# Altium PCB PCB_Final.PcbDoc (part 1 of 2)
Units mm, origin at the board's own origin, x right, y up, seen from the top; angles counter-clockwise.
Board outline 220 x 130 mm, 2 copper layers (Top Layer, Bottom Layer); 112 components, 88 nets, 442 pads, 69 vias.
Unrouted connection lines stored in the file: 1.
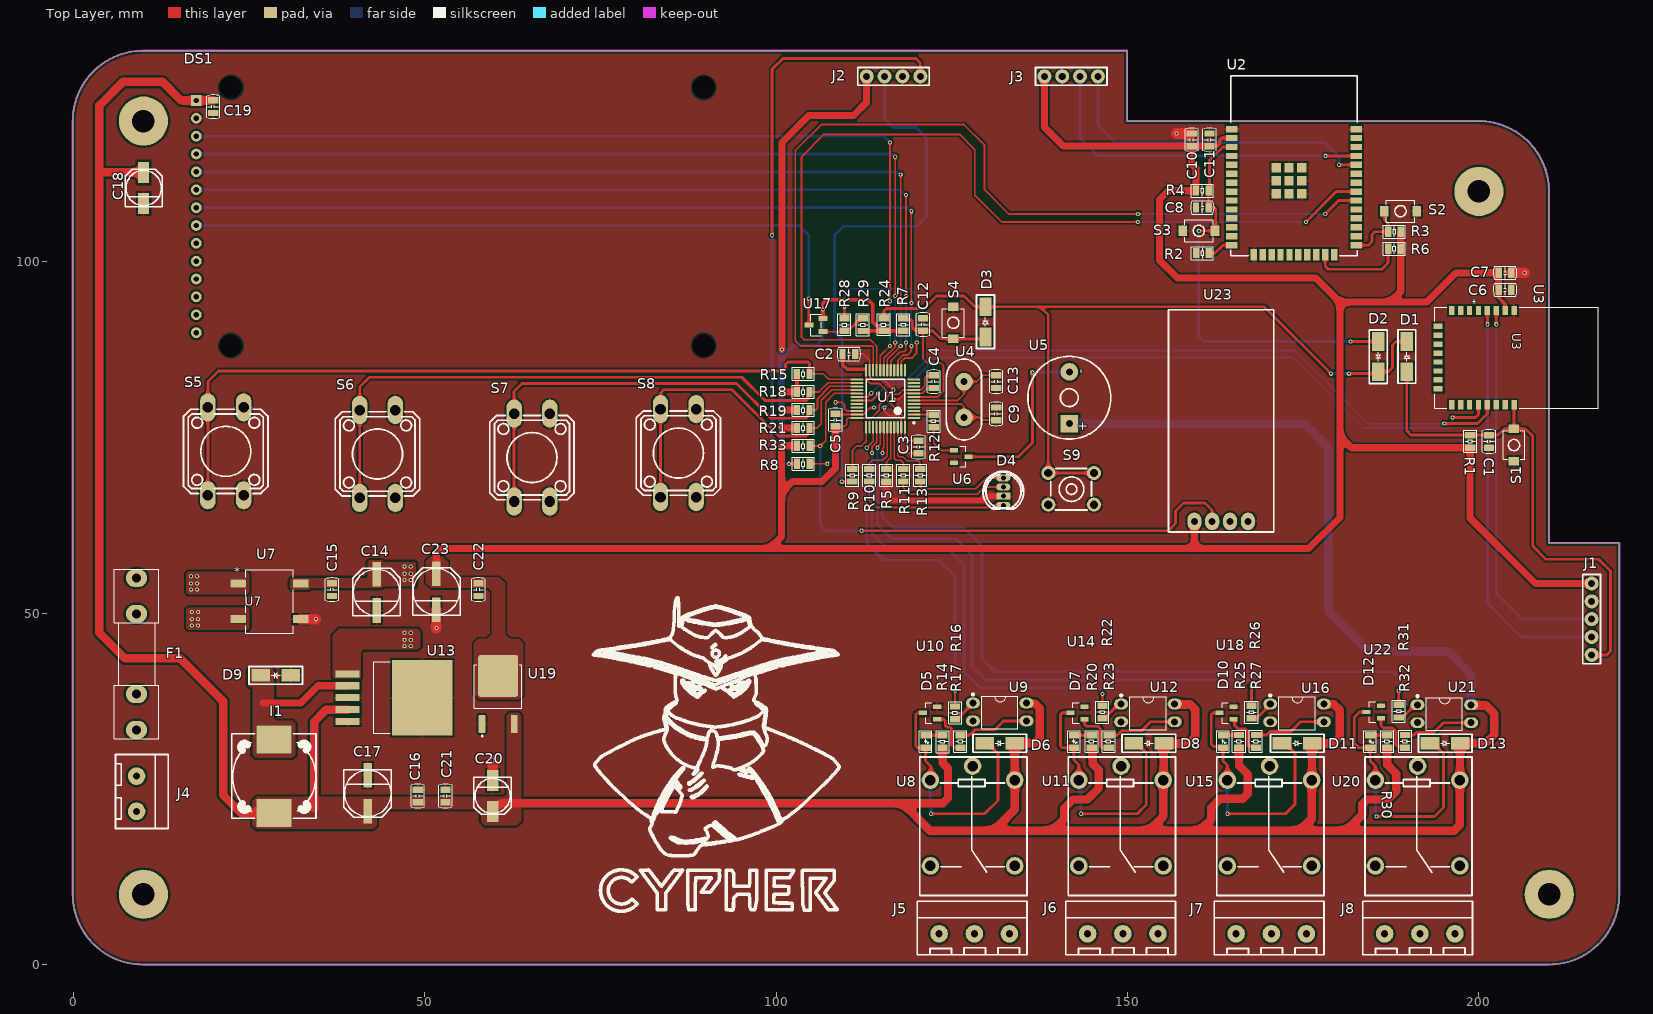
[diagram p0: Top Layer view]
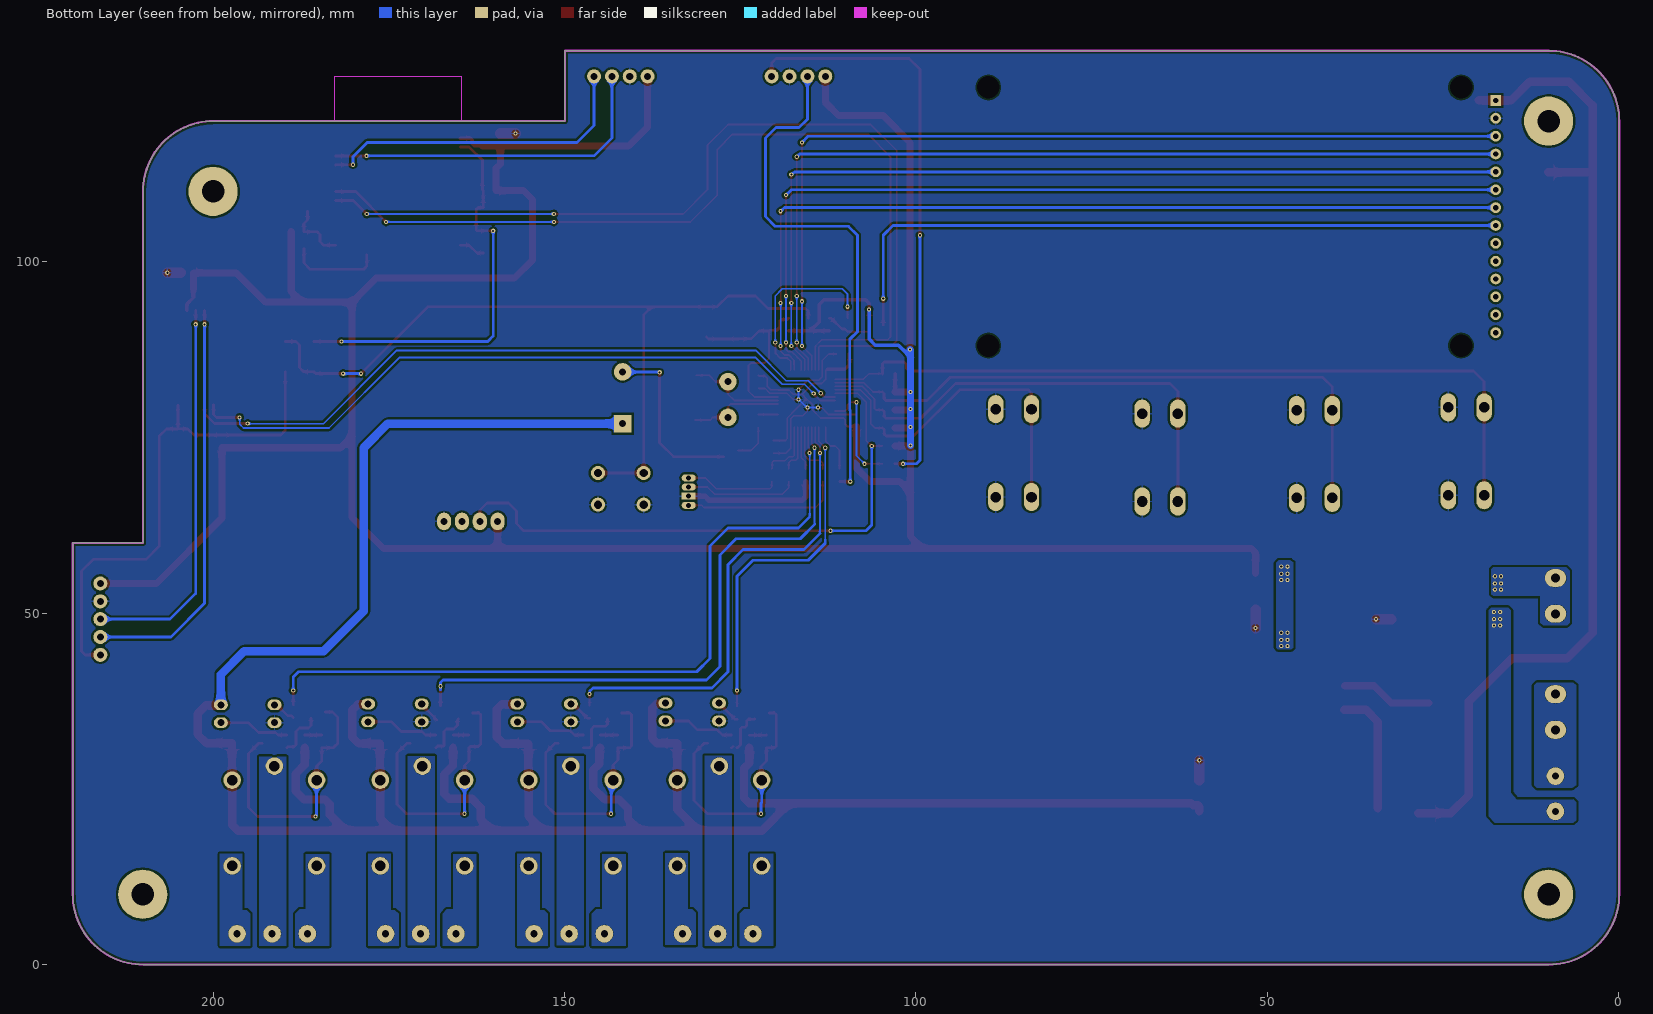
[diagram p1: Bottom Layer view, seen from below]
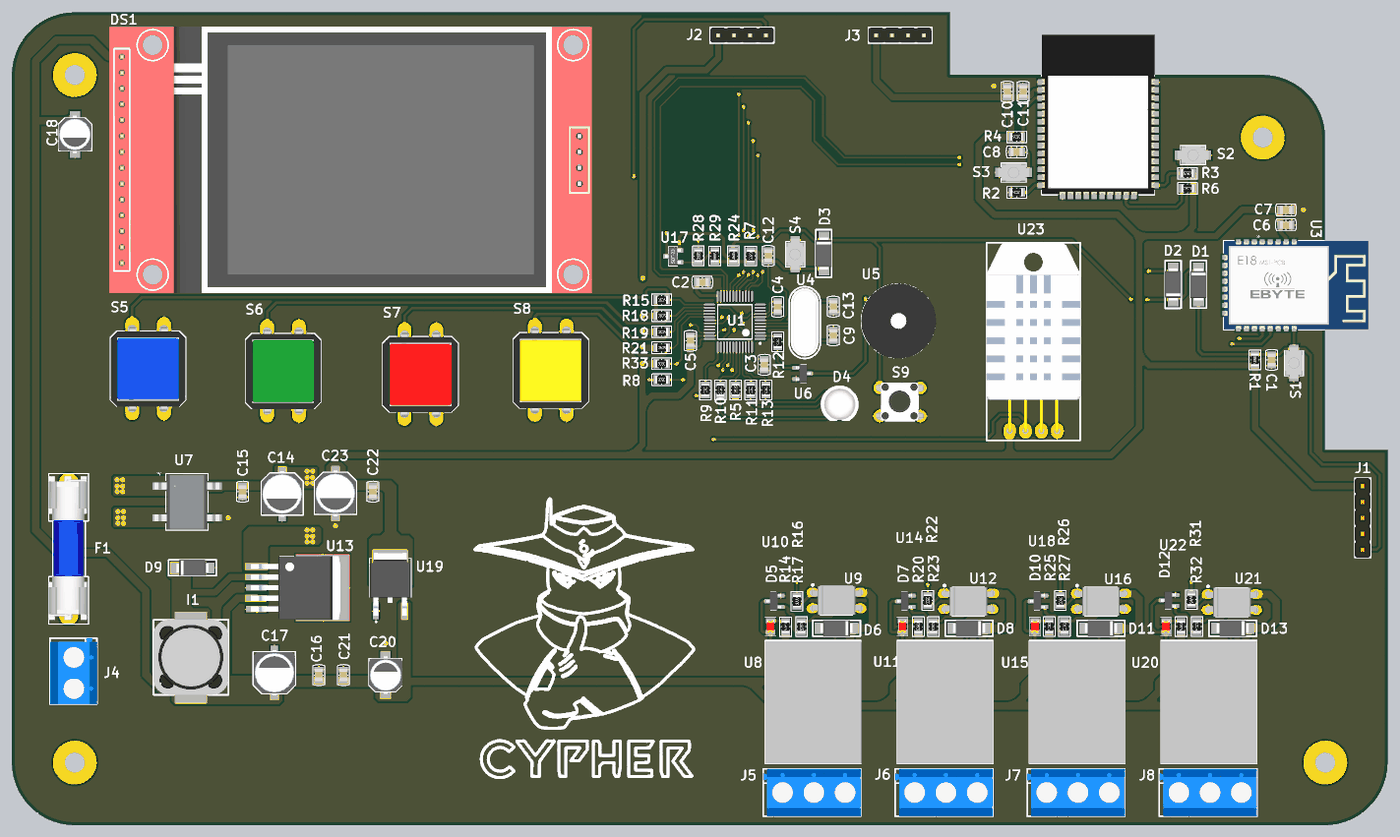
[diagram p2: 3D render of the assembled board from above, using the file's embedded part models]

## Layer stack, top to bottom
Top Solder: solder mask 0.0102, Solder Resist, Dk 3.5
Top Layer: signal copper 0.0356
Dielectric 1: dielectric 0.32, FR-4, Dk 4.8
Bottom Layer: signal copper 0.0356
Bottom Solder: solder mask 0.0102, Solder Resist, Dk 3.5

## Board outline
-0.047,10.006 -0.047,120.006 cw(c9.953,120.006) 9.953,130.006 149.953,130.006 149.953,120.006 199.953,120.006 cw(c199.953,110.006) 209.953,110.006 209.953,60.006 219.953,60.006 219.953,10.006 cw(c209.953,10.006) 209.953,0.006 9.953,0.006 cw(c9.953,10.006)

## Design rules (kind name [scope] priority, off if disabled: settings)
Clearance [All] p1: gap=0.2 ignorepadtopadclearanceinfootprint=FALSE except(0.3: Arc-Fill Arc-Poly Arc-Region Track-Fill Track-Poly Track-Region SMDPad-Fill SMDPad-Poly SMDPad-Region THPad-Fill THPad-Poly THPad-Region Via-Fill Via-Poly Via-Region Fill-Fill Fill-Poly Fill-Region Poly-Poly Poly-Region Region-Region)
PolygonConnect Power [InNet('+12') Or InNet('+5') Or InNet('+3.3')] p1: connectstyle=Direct reliefconductorwidth=0.254 reliefentries=4 polygonreliefangle="90 Angle" airgapwidth=0.254
PolygonConnect GND_PL [InNet('GND')] p2: connectstyle=Relief reliefconductorwidth=0.254 reliefentries=4 polygonreliefangle="90 Angle" airgapwidth=0.254
RoutingVias [All] p1: holewidth=0.3 width=0.6 viastyle="Through Hole" minholewidth=0.3 minwidth=0.6 maxholewidth=0.3 maxwidth=0.6
SolderMaskExpansion [All] p1: expansion=0.102 istentingtop=FALSE
SupplyNets "Schematic Supply Nets_3" [InNet('+12')] p1: voltage=0.000
SupplyNets "Schematic Supply Nets_2" [InNet('+3.3')] p2: voltage=0.000
SupplyNets "Schematic Supply Nets_1" [InNet('GND')] p3: voltage=0.000
SupplyNets "Schematic Supply Nets" [InNet('+5')] p4: voltage=0.000
Width GND [InNet('GND')] p1: maxlimit=1.5 minlimit=0.25 preferedwidth=0.8
Width 12V [InNet('+12')] p2: maxlimit=2 minlimit=0.3 preferedwidth=1
Width 5V [InNet('+5')] p3: maxlimit=1.2 minlimit=0.25 preferedwidth=0.6
Width 3.3V [InNet('+3.3')] p4: maxlimit=1 minlimit=0.25 preferedwidth=0.5
Width SIG [All] p5: maxlimit=0.4 minlimit=0.15 preferedwidth=0.25
30 further rules are at their usual default settings.

## Classes and differential pairs
component class Nguyen_Ly: C1 C2 C3 C4 C5 C6 C7 C8 C9 C10 C11 C12 C13 C14 C15 C16 C17 C18 C19 C20 C21 C22 C23 D1 D2 D3 D4 D5 D6 D7 D8 D9 D10 D11 D12 D13 DS1 F1 I1 J1 J2 J3 J4 J5 J6 J7 J8 R1 R2 R3 R4 R5 R6 R7 R8 R9 R10 R11 R12 R13 R16 R17 R18 R19 R20 R21 R22 R23 R24 R25 R26 R27 R28 R29 R30 R31 R32 R33 S1 S2 S3 S4 S5 S6 S7 S8 S9 U1 U2 U3 U4 U5 U6 U7 U8 U9 U11 U13 U19 U20 U21 U22 U23

## Components (designator, comment, footprint, x,y, rotation, side; value= is the part's Value field where it differs from the comment)
C1 "100nF" "CAPACITOR 0805" 201.422,74.433 r90 top
C2 "100nF" "CAPACITOR 0805" 110.363,86.868 r180 top
C3 "100nF" "CAPACITOR 0805" 120.269,73.649 r90 top
C4 "100nF" "CAPACITOR 0805" 122.428,82.931 r90 top
C5 "100nF" "CAPACITOR 0805" 108.458,77.47 r270 top
C6 "100nF" "CAPACITOR 0805" 203.708,96.012 r180 top
C7 "10uF" "CAPACITOR 0805" 203.708,98.425 r180 top
C8 "100nF" "CAPACITOR 0805" 160.644,107.696 r0 top
C9 "100nF" "CAPACITOR 0805" 131.318,78.359 r90 top
C10 "100nF" "CAPACITOR 0805" 159.131,117.337 r270 top
C11 "10uF" "CAPACITOR 0805" 161.671,117.337 r270 top
C12 "CAPACITOR 0805" "CAPACITOR 0805" 120.904,91.059 r270 top
C13 "100nF" "CAPACITOR 0805" 131.318,82.942 r270 top
C14 "220uF/16V" ALUMINUM_7mm 43.18,52.959 r0 top
C15 "100nF" "CAPACITOR 0805" 36.83,53.351 r90 top
C16 "100nF" "CAPACITOR 0805" 49.022,23.992 r270 top
C17 "220uF" ALUMINUM_7mm 41.91,24.384 r180 top
C18 "47uF" ALUMINUM_5mm 10.033,110.49 r0 top
C19 "100nF" "CAPACITOR 0805" 19.939,122.058 r90 top
C20 "47uF" ALUMINUM_5mm 59.69,24.003 r180 top
C21 "100nF" "CAPACITOR 0805" 52.959,23.992 r270 top
C22 "100nF" "CAPACITOR 0805" 57.658,53.351 r90 top
C23 "220uF" ALUMINUM_7mm 51.689,53.046 r0 top
D1 "M7" DIODE_SMA 189.738,86.496 r0 top
D2 "M7" DIODE_SMA 185.674,86.496 r180 top
D3 "M7" DIODE_SMA 129.794,91.44 r0 top
D4 "LED_RGB" LED_RGB_5mm 132.334,67.295 r90 top
D5 "LED_0805_RED" LED_0805_RED 121.285,31.75 r180 top
D6 "M7" DIODE_SMA 131.826,31.496 r270 top
D7 "LED_0805_RED" LED_0805_RED 142.367,31.75 r180 top
D8 "M7" DIODE_SMA 153.035,31.496 r270 top
D9 "SS34" DIODE_SMA 28.829,41.148 r90 top
D10 "LED_0805_RED" LED_0805_RED 163.576,31.75 r180 top
D11 "M7" DIODE_SMA 174.126,31.496 r270 top
D12 "LED_0805_RED" LED_0805_RED 184.531,31.75 r180 top
D13 "M7" DIODE_SMA 195.19,31.496 r270 top
DS1 "TFT 2.4 Inch" "TFT 2.4 Inch" 15.526,85.066 r0 top
F1 "F1A" Fuse 9.017,44.196 r90 top value=Fuse
I1 "1260" 1260 28.575,26.797 r270 top
J1 "CC DEBUGGER" MALE-2.54-5P 216.027,49.149 r0 top
J2 "ST LINK" MALE-2.54-4P 116.713,126.365 r90 top
J3 "USB TTL" MALE-2.54-4P 141.986,126.365 r90 top
J4 "12AC" BORNE-5.00-2P 9.779,24.638 r180 top
J5 "BORNE-5.00-3P" BORNE-5.00-3P 127.889,5.207 r270 top
J6 "BORNE-5.00-3P" BORNE-5.00-3P 149.013,5.207 r270 top
J7 "BORNE-5.00-3P" BORNE-5.00-3P 170.138,5.207 r270 top
J8 "BORNE-5.00-3P" BORNE-5.00-3P 191.262,5.207 r270 top
R1 "RESISTOR_0805" RESISTOR_0805 198.755,74.433 r270 top
R2 "10K" RESISTOR_0805 160.666,101.219 r180 top
R3 "10K" RESISTOR_0805 187.971,104.267 r180 top
R4 "RESISTOR_0805" RESISTOR_0805 160.655,110.109 r180 top
R5 "RESISTOR_0805" RESISTOR_0805 115.691,69.605 r90 top
R6 "10K" RESISTOR_0805 187.971,101.854 r0 top
R7 "RESISTOR_0805" RESISTOR_0805 118.11,91.059 r270 top
R8 "33" RESISTOR_0805 103.878,71.247 r180 top
R9 "33" RESISTOR_0805 110.851,69.618 r270 top
R10 "220" RESISTOR_0805 113.269,69.618 r270 top
R11 "220" RESISTOR_0805 118.105,69.618 r270 top
R12 "1K" RESISTOR_0805 122.428,77.332 r270 top
R13 "220" RESISTOR_0805 120.523,69.618 r270 top
R14 "220" RESISTOR_0805 123.698,31.739 r270 top
R15 "RESISTOR_0805" RESISTOR_0805 103.865,84.032 r0 top
R16 "1K" RESISTOR_0805 125.476,35.814 r270 top
R17 "1K" RESISTOR_0805 126.238,31.75 r270 top
R18 "RESISTOR_0805" RESISTOR_0805 103.865,81.474 r0 top
R19 "RESISTOR_0805" RESISTOR_0805 103.865,78.917 r0 top
R20 "220" RESISTOR_0805 144.907,31.75 r270 top
R21 "RESISTOR_0805" RESISTOR_0805 103.865,76.359 r0 top
R22 "1K" RESISTOR_0805 146.431,35.941 r270 top
R23 "1K" RESISTOR_0805 147.32,31.75 r270 top
R24 "RESISTOR_0805" RESISTOR_0805 115.316,91.059 r90 top
R25 "220" RESISTOR_0805 165.862,31.761 r270 top
R26 "1K" RESISTOR_0805 167.64,35.93 r270 top
R27 "1K" RESISTOR_0805 168.275,31.761 r270 top
R28 "220" RESISTOR_0805 109.728,91.059 r90 top
R29 "10K" RESISTOR_0805 112.343,91.046 r90 top
R30 "220" RESISTOR_0805 186.944,31.75 r270 top
R31 "1K" RESISTOR_0805 188.595,36.068 r270 top
R32 "1K" RESISTOR_0805 189.484,31.761 r270 top
R33 "10K" RESISTOR_0805 103.878,73.805 r180 top
S1 "PUSH_BUTTON_SMD_3X4X2" PUSH_BUTTON_SMD_3X4X2 204.978,73.914 r90 top
S2 "PUSH_BUTTON_SMD_3X4X2" PUSH_BUTTON_SMD_3X4X2 188.849,107.188 r0 top
S3 "PUSH_BUTTON_SMD_3X4X2" PUSH_BUTTON_SMD_3X4X2 160.147,104.394 r0 top
S4 "PUSH_BUTTON_SMD_3X4X2" PUSH_BUTTON_SMD_3X4X2 125.222,91.313 r270 top
S5 "PUSH_BUTTON_12X12" PUSH_BUTTON_12X12_BLUE 21.717,73.025 r90 top
S6 "PUSH_BUTTON_12X12" PUSH_BUTTON_12X12_GREEN 43.307,72.644 r90 top
S7 "PUSH_BUTTON_12X12" PUSH_BUTTON_12X12_RED 65.278,72.136 r90 top
S8 "PUSH_BUTTON_12X12" PUSH_BUTTON_12X12_YELLOW 86.106,72.771 r90 top
S9 "PUSH_BUTTON_6X6" PUSH_BUTTON_6X6 141.986,67.691 r180 top
U1 "STM32F103C8T6" STM-LQFP48_N 115.57,80.518 r180 top
U2 "ESP32-WROOM-32D" ESP32-WROOM-32D 173.683,109.915 r0 top
U3 "E18-MS1-PCB" E18-MS1-PCB_BYT 205.359,86.36 r270 top
U4 "8 MHz" CRISTAL_16Mhz 126.746,80.391 r270 top
U5 "BUZZER" BUZZER_12mm 141.732,80.645 r270 top
U6 "J3Y" J3Y 126.365,72.263 r270 top
U7 "DB107S" DB107S 27.94,51.689 r0 top
U8 "RELE" RELE 128.079,19.685 r270 top
U9 "PC817" PC817_DIP 131.826,35.941 r270 top
U10 "MMBT2222A" J3Y 121.92,35.814 r90 top
U11 "RELE" RELE 149.204,19.685 r270 top
U12 "PC817" PC817_DIP 152.908,35.814 r270 top
U13 "LM2596" LM2596 45.387,37.973 r180 top
U14 "MMBT2222A" J3Y 142.875,35.814 r90 top
U15 "RELE" RELE 170.328,19.685 r270 top
U16 "PC817" PC817_DIP 174.117,35.814 r270 top
U17 "AP3P080N" SOT23-3 105.68,90.998 r0 top
U18 "MMBT2222A" J3Y 164.084,35.814 r90 top
U19 "AMS1117-TO252" AMS117-TO252 60.452,38.481 r0 top
U20 "RELE" RELE 191.389,19.685 r270 top
U21 "PC817" PC817_DIP 195.072,35.687 r270 top
U22 "MMBT2222A" J3Y 185.039,35.941 r90 top
U23 "DHT22" DHT22_90 163.322,77.343 r270 top

## Footprints (in the part's own frame and the unit in brackets; to place one, negate y for a bottom-side part, rotate by r counter-clockwise, add the part's x,y. Pads: shape width x height; smd on the part's side, far side on the other; paste and mask are expansions set on the pad)
1260 [mm]
  rect 4x5 smd: 1(-5.25,0) 2(5.25,0)
  silkscreen extent -6.04,-6 5.96,6, body extent -6.07,-6.02 5.93,5.98, height 7.46
ALUMINUM_5mm [mm] "ALUMINUM CAPACITOR 5mm"
  rect 1.6x3 smd: 1(0,2.213) 2(0,-2.213)
  silkscreen extent -2.64,-2.66 2.66,2.64, body extent -2.67,-2.99 2.63,3.01, height 5.81
ALUMINUM_7mm [mm] "ALUMINUM CAPACITOR 7mm"
  rect 1.2x3.5 smd: 1(0,2.58) 2(0,-2.58)
  silkscreen extent -3.38,-3.36 3.38,3.4, body extent -3.32,-3.64 3.28,3.66, height 5.8
AMS117-TO252 [mm]
  rrect25% 0.95x2.59 smd: 1(-2.286,-4.26) 3(2.286,-4.26)
  rrect10% 5.63x5.94 smd: 2(0,2.59)
  silkscreen extent -3.35,-6.07 3.35,4.19, body extent -3.3,-5.05 3.3,5.05, height 2.2
BORNE-5.00-2P [mm]
  round 2.5 hole 1: 1(0.753,2.821) 2(0.753,-2.18)
  silkscreen extent -3.75,-5.27 3.75,5.27, body extent -3.86,-5.28 3.74,5.32, height 10.1
BORNE-5.00-3P [mm]
  round 2.5 hole 1: 1(0.815,5.318) 2(0.815,0.317) 3(0.815,-4.683)
  silkscreen extent -3.8,-7.81 3.8,7.81, body extent -3.8,-7.79 3.8,7.81, height 10.1
BUZZER_12mm [mm] "BUZZER MAGNETIC 12MM"
  rect 2.5x2.5 hole 1: 1(3.688,0)
  round 2.5 hole 1: 2(-3.688,0)
  silkscreen extent -5.9,-5.9 5.89,5.88, body extent -6,-5.98 5.99,6.02, height 9.51
"CAPACITOR 0805" [mm]
  rect 0.9x1.45 smd: 1(-0.9,0) 2(0.9,0)
  silkscreen extent -1.68,-0.95 1.67,0.95, body extent -1.03,-0.62 0.97,0.63, height 0.61
CRISTAL_16Mhz [mm] "CRYSTAL 16MHZ PTH"
  round 2.5 hole 1: 1(-2.54,0) 2(2.54,0)
  silkscreen extent -5.75,-2.56 5.75,2.56, body extent -5.56,-2.24 5.44,2.26, height 3.55
DB107S [mm]
  rect 2.224x1.142 smd paste+0 mask+0: 1(-4.432,2.55) 2(-4.432,-2.55) 3(4.432,-2.55) 4(4.432,2.55)
  silkscreen extent -3.38,-4.52 3.38,4.52, body extent -5.19,-4.39 5.19,4.39, height 3.41
DHT22_90 [mm]
  oval 2.5x2 hole 1: 1(14.287,-3.81) 2(14.287,-1.27) 3(14.287,1.27) 4(14.287,3.81)
  silkscreen extent -15.81,-7.49 15.81,7.49, body extent -15.81,-7.55 14.54,7.55, height 7.73
DIODE_SMA [mm] "Diode SMA"
  rect 1.75x2.65 smd: 1(0,-2.15) 2(0,2.15)
  silkscreen extent -1.27,-3.8 1.27,3.82, body extent -1.3,-2.6 1.3,2.6, height 2.2
E18-MS1-PCB_BYT [mil]
  rect 51x30 smd paste+0 mask+0: 1(-264,-13.78) 2(-264,-63.78) 3(-264,-113.78) 4(-264,-163.78) 5(-264,-213.78) 6(-264,-263.78) 7(-264,-313.78) 8(-264,-363.78) 17(264,-363.78) 18(264,-313.78) 19(264,-263.78) 20(264,-213.78) 21(264,-163.78) 22(264,-113.78) 23(264,-63.78) 24(264,-13.78)
  rect 30x51 smd paste+0 mask+0: 9(-175,-439.5) 10(-125,-439.5) 11(-75,-439.5) 12(-25,-439.5) 13(25,-439.5) 14(75,-439.5) 15(125,-439.5) 16(175,-439.5)
  silkscreen extent -283,-458 283,458, body extent -280,-455 280,453, height 94
ESP32-WROOM-32D [mm] "Chip SMD 39 Pads 18x25.5mm w/ Antenna."
  rect 1.65x0.9 smd: 1(-8.875,8.943) 2(-8.875,7.673) 3(-8.875,6.403) 4(-8.875,5.133) 5(-8.875,3.863) 6(-8.875,2.593) 7(-8.875,1.323) 8(-8.875,0.053) 9(-8.875,-1.217) 10(-8.875,-2.487) 11(-8.875,-3.757) 12(-8.875,-5.027) 13(-8.875,-6.297) 14(-8.875,-7.567) 25(8.875,-7.567) 26(8.875,-6.297) 27(8.875,-5.027) 28(8.875,-3.757) 29(8.875,-2.487) 30(8.875,-1.217) 31(8.875,0.053) 32(8.875,1.323) 33(8.875,2.593) 34(8.875,3.863) 35(8.875,5.133) 36(8.875,6.403) 37(8.875,7.673) 38(8.875,8.943)
  rect 0.9x1.65 smd: 15(-5.72,-8.942) 16(-4.45,-8.942) 17(-3.18,-8.942) 18(-1.91,-8.942) 19(-0.64,-8.942) 20(0.63,-8.942) 21(1.9,-8.942) 22(3.17,-8.942) 23(4.44,-8.942) 24(5.71,-8.942)
  rect 1.33x1.33 smd: 39(-2.544,-0.244) 39(-2.544,1.591) 39(-2.544,3.426) 39(-0.709,-0.244) 39(-0.709,1.591) 39(-0.709,3.426) 39(1.126,-0.244) 39(1.126,1.591) 39(1.126,3.426)
  Keep-Out Layer region: -9,10.168 9,10.168 9,16.468 -9,16.468
  silkscreen extent -9,-9.07 9,16.54, body extent -9.03,-9.05 9.04,16.49, height 3
Fuse [mil] "De Fuse"
  oval 100x120 hole 50: 1(-425,0) 1(-225,0) 2(225,0) 2(425,0)
  silkscreen extent -475,-125 475,125, body extent -448,-117 459,127, height 378
J3Y [mil] "SOT-23-3"
  rect 25x45 smd: 1(-35,-40) 2(35,-40) 3(0,40)
  silkscreen extent -58,-10 58,25, body extent -57,-42 57,52, height 49
LED_0805_RED [mm]
  rect 1.45x0.9 smd: 1(0,-0.9) 2(0,0.9)
  silkscreen extent -0.89,-1.53 0.9,1.52, body extent -0.62,-1.02 0.63,0.98, height 1.1
LED_RGB_5mm [mm]
  oval 1x2 hole 0.7: 1(-1.95,0) 3(0.65,0) 4(1.95,0)
  rect 1x2 hole 0.7: 2(-0.65,0)
  silkscreen extent -2.51,-2.9 2.95,2.9, body extent -2.47,-2.96 2.97,2.94, height 8.95
LM2596 [mm] "TO-263-5"
  rect 3.4x1 smd paste-3 mask+0: 1(6.33,-3.4) 2(6.33,-1.7) 3(6.33,0) 4(6.33,1.7) 5(6.33,3.4)
  rect 8.6x10.7 smd paste-6 mask+0: 6(-4.27,0)
  silkscreen extent 0.25,-5.08 2.64,5.08, body extent -7.11,-5.08 7.24,5.08, height 4.65
MALE-2.54-4P [mm]
  round 2 hole 1: 1(0,-3.81) 2(0,-1.27) 3(0,1.27) 4(0,3.81)
  silkscreen extent -1.27,-5.08 1.27,5.07, body extent -1.21,-5.09 1.19,5.07, height 8.36
MALE-2.54-5P [mm]
  round 2 hole 1: 1(0,-5.08) 2(0,-2.54) 3(0,0) 4(0,2.54) 5(0,5.08)
  silkscreen extent -1.27,-6.35 1.27,6.34, body extent -1.33,-6.36 1.21,6.34, height 8.89
PC817_DIP [mm] "DIP-4"
  oval 1.524x2 hole 1: 1(-1.27,-3.81) 2(1.27,-3.81) 3(1.27,3.81) 4(-1.27,3.81)
  silkscreen extent -2.63,-3.96 2.38,2.58, body extent -2.27,-3.93 2.31,3.95, height 4.16
PUSH_BUTTON_6X6 [mm]
  round 2 hole 1.2: 1(-3.25,-2.25) 1(3.25,-2.25) 2(-3.25,2.25) 2(3.25,2.25)
  silkscreen extent -2.9,-2.9 2.9,3, body extent -3.94,-3.07 4.07,2.93, height 6.8
PUSH_BUTTON_12X12_BLUE [mm]
  oval 4x2.2 hole 1.5: 1(-6.251,2.54) 1(6.251,2.54) 2(-6.251,-2.54) 2(6.251,-2.54)
  silkscreen extent -5.99,-6 5.99,6, body extent -6.77,-6.01 6.65,6, height 8.84
PUSH_BUTTON_12X12_GREEN [mm]
  oval 4x2.2 hole 1.5: 1(-6.251,2.54) 1(6.251,2.54) 2(-6.251,-2.54) 2(6.251,-2.54)
  silkscreen extent -5.99,-6 5.99,6, body extent -6.77,-6.01 6.65,6, height 8.84
PUSH_BUTTON_12X12_RED [mm]
  oval 4x2.2 hole 1.5: 1(-6.251,2.54) 1(6.251,2.54) 2(-6.251,-2.54) 2(6.251,-2.54)
  silkscreen extent -5.99,-6 5.99,6, body extent -6.77,-6.01 6.65,6, height 8.84
PUSH_BUTTON_12X12_YELLOW [mm]
  oval 4x2.2 hole 1.5: 1(-6.251,2.54) 1(6.251,2.54) 2(-6.251,-2.54) 2(6.251,-2.54)
  silkscreen extent -5.99,-6 5.99,6, body extent -6.77,-6.01 6.65,6, height 8.84
PUSH_BUTTON_SMD_3X4X2 [mm]
  rect 1.23x1.5 smd: 1(-2.3,0) 2(2.3,0)
  silkscreen extent -2.03,-1.54 2.03,1.54, body extent -2.49,-1.45 2.51,1.45, height 2
RELE [mm]
  round 2.5 hole 1.5: 1(-6.565,5.88) 2(-6.565,-6.12) 3(-8.565,-0.12) 4(5.635,5.88) 5(5.635,-6.12)
  silkscreen extent -9.84,-7.62 9.84,7.62, body extent -9.74,-7.7 9.86,7.7, height 15.5
RESISTOR_0805 [mm]
  rect 0.9x1.45 smd: 1(-0.9,0) 2(0.9,0)
  silkscreen extent -1.56,-0.93 1.57,0.93, body extent -0.98,-0.64 1.02,0.61, height 0.46
SOT23-3 [mm]
  rect 1.25x0.7 smd paste+0 mask+0.051: D(-1,0) G(1,-0.95) S(1,0.95)
  silkscreen extent -0.73,-1.53 0.73,1.53, body extent -1.25,-1.5 1.25,1.5, height 1.1
STM-LQFP48_N [mm] "QFP, 48-Leads, Body 7x7mm, Pitch 0.5mm, IPC Medium Density"
  oval 1.8x0.3 smd: 1(-4.05,2.75) 2(-4.05,2.25) 3(-4.05,1.75) 4(-4.05,1.25) 5(-4.05,0.75) 6(-4.05,0.25) 7(-4.05,-0.25) 8(-4.05,-0.75) 9(-4.05,-1.25) 10(-4.05,-1.75) 11(-4.05,-2.25) 12(-4.05,-2.75) 25(4.05,-2.75) 26(4.05,-2.25) 27(4.05,-1.75) 28(4.05,-1.25) 29(4.05,-0.75) 30(4.05,-0.25) 31(4.05,0.25) 32(4.05,0.75) 33(4.05,1.25) 34(4.05,1.75) 35(4.05,2.25) 36(4.05,2.75)
  oval 0.3x1.8 smd: 13(-2.75,-4.05) 14(-2.25,-4.05) 15(-1.75,-4.05) 16(-1.25,-4.05) 17(-0.75,-4.05) 18(-0.25,-4.05) 19(0.25,-4.05) 20(0.75,-4.05) 21(1.25,-4.05) 22(1.75,-4.05) 23(2.25,-4.05) 24(2.75,-4.05) 37(2.75,4.05) 38(2.25,4.05) 39(1.75,4.05) 40(1.25,4.05) 41(0.75,4.05) 42(0.25,4.05) 43(-0.25,4.05) 44(-0.75,4.05) 45(-1.25,4.05) 46(-1.75,4.05) 47(-2.25,4.05) 48(-2.75,4.05)
  silkscreen extent -4.18,-2.75 2.75,3.57, body extent -3.5,-3.5 3.5,3.5, height 1.6
"TFT 2.4 Inch" [mil]
  round 60 hole 30: 1(78.74,190.94) 1(78.74,190.94) 2(78.74,290.94) 3(78.74,390.94) 4(78.74,490.94) 5(78.74,590.94) 6(78.74,690.94) 7(78.74,790.94) 8(78.74,890.94) 9(78.74,990.94) 10(78.74,1090.94) 11(78.74,1190.94) 12(78.74,1290.94) 13(78.74,1390.94)
  round 0 hole 125.98: 1(272.44,118.11) 2(272.44,1563.78) 3(2920.47,1563.78) 4(2920.47,118.11)
  rect 60x60 hole 30: 14(78.74,1490.94)
  body extent 0,0 3038,1681, height 346

## Part data
C1 C2 C3 C4 C5 C6 C7 C8 C9 C10 C11 C13 C15 C16 C19 C21 C22: library part "CAPACITOR 0805", "Generic Capacitor 0805, 2x1.25x1.4mm."
C12: "Generic Capacitor 0805, 2x1.25x1.4mm."
C14: "Aluminum Capacitor 220uF/16V 7mm"
C17 C23: library part 220uF/16V, "Aluminum Capacitor 220uF/16V 7mm"
C18 C20: library part 47uF/16V, "Aluminum Capacitor 47uF/16V 5mm"
D1 D2 D3 D6 D8 D11 D13: "Rectifiers Diode 1000V 1A SMA", JLCPCB PN=C330214, ComponentLink1Description=Datasheet, Digikey PN=3191-M7CT-ND, Mouser PN=637-M7
D4: library part LED_RGB_5mm, "LED RGB 4 Pins 5mm Common Cathode.", JLCPCB PN=C2837021
D5 D7 D10 D12: "LED 0805 Red.", JLCPCB PN=C113551
D9: "Rectifier Schottky 40V 3A SMA", JLCPCB=C2909963, ComponentLink1Description=Datasheet, Digikey PN=SS34FSTR-ND, Mouser PN=512-SS34
DS1: "2.4-inch TFT LCD module, 14-pin interface"
F1: library part Fuse, "Fuse", Designed by=VanDungEvn
I1: "Generic Encapsulated Inductor 1260."
J1: library part MALE-2.54-5P, "Male Header Connector 2.54mm 5 Pins.", JLCPCB PN=C492404
J2 J3: library part MALE-2.54-4P, "Male Header Connector 2.54mm 4 Pins.", JLCPCB PN=C492403
J4: library part BORNE-5.00-2P, "Borne 2 Vias, Pitch 5mm.", JLCPCB PN=C91153
J5 J6 J7 J8: "Borne 3 Vias, Pitch 5mm.", JLCPCB PN=C91154
R1 R4 R5 R7 R15 R18 R19 R21 R24: "Generic Resistor 0805."
R2 R3 R6 R8 R9 R10 R11 R12 R13 R14 R16 R17 R20 R22 R23 R25 R26 R27 R28 R29 R30 R31 R32 R33: library part RESISTOR_0805, "Generic Resistor 0805."
S1 S2 S3 S4: "Push Button Tactile Switch SMD 2 Pins 3x4x2mm.", JLCPCB PN=C231644
S5 S6 S7 S8: "Push Button Tactile Switch PTH 4 Pins 12x12mm.", JLCPCB PN=C84931, Mouser PN=992-BUTT-12-5
S9: "Push Button Tactile Switch PTH 4 Pins 6x6mm.", JLCPCB PN=C255811
U1: "ARM Cortex-M3 32-bit MCU, 64 KB Flash, 20 KB Internal RAM, 37 I/Os, 48-pin LQFP, -40 to 85 degC, Tray", I/Os (High Current)=37, Operating Frequency(F) (Processor speed) (MHz)=72, Supplier Part Number 1=497-6063-ND, Supply Voltage(Vcc) min (V)=2, A/D Converter="2x12-bit (10 Channel)", ComponentLink1Description="Manufacturer URL", ComponentLink1URL=http://www.st.com/web/en/home.html, ComponentLink2Description=Datasheet, ComponentLink2URL=http://www.st.com/st-web-ui/static/active/en/resource/technical/document/datasheet/CD00161566.pdf, ComponentLink3Description="Package Specification", ComponentLink3URL=http://www.st.com/st-web-ui/static/active/en/resource/technical/document/datasheet/DM00058181.pdf, Core="ARM Cortex-M3", DatasheetVersion="Rev. 16", FLASH Size (Prog) (kB)=64, Internal RAM Size (kB)=20, Mounting Technology="Surface Mount", PackageDescription="48-Pin Low Profile Quad Flat Package, 7 x 7 mm Body, 0.5 mm Pitch", PackageReference=LQFP48, PackageVersion="Rev. 6, 06/2013", Packing=Tray, PartNumber=STM32F103C8T6, Supplier 1=Digi-Key, Supplier 2=Farnell, Supplier 3=Newark, Supplier 4=Newark, Supplier 5=Mouser, Supplier Part Number 2=1447637, Supplier Part Number 3=59M2182, Supplier Part Number 4=57P1222, Supplier Part Number 5=511-STM32F103C8T6
U2: "Chip SMD 39 Pads Wifi 2.4GHz BLE 4.2 18x25.5mm w/ Antenna.", JLCPCB PN=C82899, ComponentLink1Description=Datasheet, ComponentLink1URL=https://www.mouser.com/datasheet/2/891/esp32_wroom_32d_esp32_wroom_32u_datasheet_en-1365844.pdf, Digikey PN=1965-ESP32-WROOM-32D-N8CT-ND, Mouser PN=ESP32-WROOM-32D-N4
U3: "No Description Available", Manufacturer_Name="Chengdu Ebyte Elec Tech", Copyright="Copyright (C) 2026 Ultra Librarian. All rights reserved.", Manufacturer_Part_Number=E18-MS1-PCB, RefDes=RefDes, Type=Type
U4: library part CRISTAL_16Mhz, "CRYSTAL 16MHZ, PTH and SMD", Digikey PN=3155-16M20P2/49US-ND, Mouser PN=449-LFXTAL022786BULK
U5: library part BUZZER_12mm, "BUZZER MAGNETIC 12MM", JLCPCB PN=C781866, Digikey PN=433-WT-1209T-ND, Mouser PN=433-WT-1209T-ND
U6: "TRANSISTOR BIPOLAR (BJT) NPN 25V 500mA SOT-23-3", JLCPCB PN=C2828466, ComponentLink1Description=Datasheet, ComponentLink1URL=https://media.digikey.com/pdf/Data%20Sheets/UTD%20Semi%20PDFs/S8050.pdf, Digikey PN=4518-S8050CT-ND
U7: "Description", Manufacturer_Name=Rectron, Copyright="Copyright (C) 2025 Ultra Librarian. All rights reserved.", Manufacturer_Part_Number=DB107S, RefDes=RefDes, Type=Type
U8 U11 U15 U20: "Generic Rele PTH 5 Pins."
U9 U12 U16 U21: "Optocouplers Phototransistor 4 Pins, DIP and SMD.", JLCPCB PN DIP=C3008368, JLCPCB PN SMD=C3025164, ComponentLink1Description=Datasheet, ComponentLink1URL=https://www.farnell.com/datasheets/73758.pdf
U10 U14 U18 U22: library part J3Y, "TRANSISTOR BIPOLAR (BJT) NPN 25V 500mA SOT-23-3", JLCPCB PN=C2828466, ComponentLink1Description=Datasheet, ComponentLink1URL=https://media.digikey.com/pdf/Data%20Sheets/UTD%20Semi%20PDFs/S8050.pdf, Digikey PN=4518-S8050CT-ND
U13: "IC BUCK STEP DOWN 3A TO-263-6", JLCPCB PN=C2980822, ComponentLink1Description=Datasheet, ComponentLink1URL=https://www.ti.com/lit/ds/symlink/lm2596.pdf, Digikey PN=4518-LM2596S-ADJCT-ND, Mouser PN=863-LM2596DSADJG
U17: "Mosfet PNP"
U19: Package="TO-252-2 Diodes Inc.", Availability="In Stock", Check_prices=https://www.snapeda.com/parts/AZ1117D-3.3TRE1/Diodes+Inc./view-part/?ref=eda, MF="Diodes Inc.", MP=AZ1117D-3.3TRE1, Price=None, Purchase-URL=https://pricing.snapeda.com/search/part/AZ1117D-3.3TRE1/?ref=eda, SnapEDA_Link=https://www.snapeda.com/parts/AZ1117D-3.3TRE1/Diodes+Inc./view-part/?ref=snap
U23: "SENSOR HUMIDITY/TEMPERATURE", Digikey PN=1528-1228-ND

## Free pads (board coordinates)
  round 7 hole 3.2: 18(10,10) 18(10,120) 18(200,110) 18(210,10)
  round 0.6 hole 0.3: 19(16.764,53.34) 19(16.764,54.229) 19(16.764,55.245) 19(16.891,48.26) 19(16.891,49.149) 19(16.891,50.165) 19(17.653,53.34) 19(17.653,54.229) 19(17.653,55.245) 19(17.78,48.26) 19(17.78,49.149) 19(17.78,50.165) 19(47.146,45.313) 19(47.146,46.202) 19(47.146,47.218) 19(47.146,54.711) 19(47.146,55.6) 19(47.146,56.616) 19(48.035,45.313) 19(48.035,46.202) 19(48.035,47.218) 19(48.035,54.711) 19(48.035,55.6) 19(48.035,56.616)

## Via types
v1: diameter 0.6, hole 0.3, Top Layer to Bottom Layer, 69 vias

## Nets (pads, with @x,y where several pads share a name; then routed paths per layer and width w, separated by ;. In a path a pad name is that pad's centre, name@x,y a point inside that pad or via, vN(x,y) a via of type N, cw(c..) or ccw(c..) an arc to the next point about the centre after c; other vN are vias at no path point)
+3.3: C2.2 C3.2 C4.2 C5.2 C6.2 C7.2 C10.2 C11.2 C22.2 C23.1 J1.5 J2.4 J3.4 R1.2 R3.1 R4.2 R6.2 R7.2 R15.1 R18.1 R19.1 R21.1 R24.1 R29.1 R33.2 U1.9 U1.24 U1.36 U1.48 U2.2 U3.2 U17.S U19.2 U23.1 | length 516.3
  Top Layer w0.25: C5.2 109.762,76.57 110.046,76.854 110.046,77.534 110.27,77.758 111.51,77.758 U1.36 113.582,77.768 114.681,78.867 114.681,79.629 115.57,80.518 ; U1.24 112.82,83.268 113.411,82.677 114.661,82.677 116.195,81.143 ; C3.2 118.618,74.549 118.32,74.847 U1.48 118.32,77.769 116.946,79.144 116.944,79.144 115.57,80.518 ; C4.2@122.417,83.82 122.352,83.755 121.474,83.755 121.158,83.439 121.158,82.296 120.649,81.787 119.639,81.787 U1.9 119.61,81.758 118.825,81.758 118.81,81.743 118.065,81.743 117.465,81.143 116.195,81.143 ; 115.57,80.518 116.195,81.143
  Top Layer w0.5: R18.1 R15.1 ; U17.S v1(106.68,93.218) 106.68,94.107 107.188,94.615 113.03,94.615 113.792,93.853 113.792,91.408 115.041,90.159 R24.1 ; C2.2 109.463,85.355 110.109,84.709 112.649,84.709 ; R29.1 112.349,90.152 115.309,90.152 R24.1 ; R7.2 R24.1 ; C11.2 161.736,116.502 162.842,116.502 163.135,116.795 163.135,117.295 163.428,117.588 U2.2 ; C6.2 202.808,94.88 203.708,93.98 203.708,93.097 U3.2
  Top Layer w1: C23.1 51.689,58.596 52.275,59.182 99.06,59.182 ; v1(100.778,76.5) 100.919,76.359 R21.1 ; v1(100.778,79.054) 100.915,78.917 R19.1 ; v1(100.778,81.474) R18.1 ; v1(100.838,87.503) 100.838,116.967 104.648,120.777 110.998,120.777 112.903,122.682 J2.4 ; R33.2 100.828,73.805 v1(100.778,73.854) 100.778,67.123 ; C5.2 108.458,70.612 106.553,68.707 102.362,68.707 100.778,67.123 ; J3.4 138.176,119.126 140.865,116.437 C11.2 ; C10.2 159.131,113.919 159.755,113.295 R4.2 155.829,110.109 154.559,108.839 154.559,100.203 157.099,97.663 176.784,97.663 180.213,94.234 ; U23.1 159.512,59.182 ; R3.1 R6.2 188.871,95.78 187.325,94.234 ; C6.2 C7.2 196.723,98.425 192.532,94.234 187.325,94.234 ; J1.5 208.026,54.229 198.755,63.5 R1.2 181.864,73.533 180.213,75.184 ; 99.06,59.182 100.778,60.9 100.778,67.123 ; 99.06,59.182 159.512,59.182 ; 159.512,59.182 175.768,59.182 180.213,63.627 180.213,75.184 ; 180.213,75.184 180.213,94.234 ; 180.213,94.234 187.325,94.234
  Bottom Layer w0.5: 100.778,86.427 102.489,88.138 105.791,88.138 106.68,89.027 v1(106.68,93.218) ; v1@100.819,87.484 v1(100.838,87.503)
  Bottom Layer w1: v1(100.778,73.854) v1(100.778,76.5) v1(100.778,79.054) v1(100.778,81.474) 100.778,86.427 100.778,87.443 v1@100.819,87.484
+5: C16.2 C17.1 C18.1 C19.2 C20.1 C21.2 D6.2 D8.2 D11.2 D13.2 DS1.14 I1.2 R14.2 R20.2 R25.2 R30.2 U5.1 U8.1 U9.4 U11.1 U12.4 U13.4 U15.1 U16.4 U19.3 U20.1 U21.4 | length 553.2
  Top Layer w1.2: C18.1 4.118,112.703 3.737,113.084 ; C19.2 19.928,122.947 17.537,122.947 DS1.14 15.367,122.936 12.7,125.603 7.112,125.603 3.737,122.228 3.737,113.084 ; I1.2 23.919,21.547 21.336,24.13 21.336,37.465 15.24,43.561 7.366,43.561 3.737,47.19 3.737,113.084 ; 34.29,22.225 34.29,34.544 36.019,36.273 U13.4 ; C20.1 59.69,22.49 59.89,22.69 60.59,22.69 60.887,22.987 117.97,22.987 ; R14.2 123.698,28.702 124.46,27.94 124.46,23.69 123.757,22.987 117.97,22.987 ; U9.4 135.698,37.149 136.838,37.149 137.541,36.446 137.541,32.199 136.838,31.496 D6.2 133.968,31.488 133.968,26.258 U8.1 133.959,22.072 130.937,19.05 ; R20.2 145.032,30.725 145.032,28.577 145.923,27.686 145.923,25.146 144.272,23.495 142.24,23.495 140.97,22.225 140.97,20.701 139.319,19.05 ; U12.4 156.78,37.022 158.936,37.022 159.639,36.319 159.639,32.385 158.699,31.445 155.134,31.445 155.134,26.301 U11.1 155.084,21.099 153.035,19.05 ; R25.2 165.862,28.321 167.132,27.051 167.132,24.325 166.429,23.622 163.195,23.622 161.925,22.352 161.925,20.701 160.274,19.05 ; U16.4 177.989,37.022 179.386,37.022 180.213,36.195 180.213,32.385 179.29,31.462 176.242,31.462 176.242,26.284 U15.1 176.208,20.76 174.498,19.05 ; R30.2 186.944,28.448 188.214,27.178 188.214,24.638 187.071,23.495 184.091,23.495 183.388,22.792 183.388,21.336 181.102,19.05 ; U21.4 198.944,36.895 200.976,36.895 202.184,35.687 202.184,32.766 200.914,31.496 D13.2 197.304,31.46 197.304,26.285 U20.1 197.269,19.85 196.469,19.05 181.102,19.05 ; 117.97,22.987 121.907,19.05 130.937,19.05 ; 130.937,19.05 139.319,19.05 ; 139.319,19.05 153.035,19.05 ; 153.035,19.05 160.274,19.05 ; 160.274,19.05 174.498,19.05 ; 174.498,19.05 181.102,19.05
  Bottom Layer w1.2: U5.1 175.138,76.957 178.562,73.533 178.562,50.292 184.277,44.577 195.58,44.577 198.882,41.275 U21.4
+12: C14.1 C15.2 pad.19@47.146,45.313 pad.19@47.146,46.202 pad.19@47.146,47.218 pad.19@47.146,54.711 pad.19@47.146,55.6 pad.19@47.146,56.616 pad.19@48.035,45.313 pad.19@48.035,46.202 pad.19@48.035,47.218 pad.19@48.035,54.711 pad.19@48.035,55.6 pad.19@48.035,56.616 U7.4 U13.1
BOOT: R5.2 U1.44 | length 6.2
  Top Layer w0.25: R5.2 115.697,70.511 115.697,71.501 116.32,72.124 U1.44
BUTTON_1: R15.2 S5.1 U1.25 | length 112.1
  Top Layer w0.25: R15.2 104.807,84.074 106.68,84.074 107.486,83.268 U1.25
  Top Layer w0.4: S5.1@19.177,66.774 19.177,79.276 19.431,79.53 19.177,79.784 19.177,82.931 20.701,84.455 100.985,84.455 101.346,84.816 101.346,85.364 101.707,85.725 104.521,85.725 104.765,85.481 R15.2
BUTTON_2: R18.2 S6.1 U1.26 | length 90
  Top Layer w0.25: R18.2 106.112,81.474 107.406,82.768 U1.26
  Top Layer w0.4: S6.1@40.767,66.393 40.767,78.895 40.767,82.169 42.164,83.566 95.123,83.566 98.435,80.254 104.293,80.254 104.527,80.488 104.527,81.237 R18.2
BUTTON_3: R19.2 S7.1 U1.27 | length 70
  Top Layer w0.25: R19.2 105.674,78.917 105.915,79.158 105.915,80.515 107.668,82.268 U1.27
  Top Layer w0.4: S7.1@62.738,65.885 62.738,78.387 62.738,81.534 63.881,82.677 94.361,82.677 99.314,77.724 104.28,77.724 104.515,77.958 104.515,78.667 R19.2
BUTTON_4: R21.2 S8.1 U1.28 | length 50.7
  Top Layer w0.25: R21.2@104.797,76.327 105.791,76.327 106.426,76.962 106.426,80.264 107.93,81.768 U1.28
  Top Layer w0.4: S8.1@83.566,66.52 83.566,79.022 83.615,79.071 83.615,81.388 84.016,81.788 93.726,81.788 100.33,75.184 104.28,75.184 104.515,75.418 104.515,76.109 R21.2
BUZZER: R12.1 U1.2 | length 2.8
  Top Layer w0.15: R12.1@122.392,78.268 R12.1
  Top Layer w0.25: U1.2 R12.1@122.392,78.268
CS: DS1.12 U1.20 | length 132
  Top Layer w0.25: U1.20 114.82,86.626 v1(116.205,88.011) ; v1(116.205,94.361) v1(116.205,116.967)
  Bottom Layer w0.25: v1(116.205,88.011) v1(116.205,94.361)
  Bottom Layer w0.4: DS1.12 115.316,117.856 v1(116.205,116.967)
DATA_DHT: R33.1 U1.29 U23.2 | length 85.1
  Top Layer w0.25: R33.1 104.796,73.787 106.299,73.787 107.061,74.549 107.061,80.01 108.319,81.268 U1.29
  Top Layer w0.4: v1(106.287,73.775) v1@106.299,73.787 ; v1(112.141,61.722) 155.829,61.722 156.845,62.738 156.845,64.516 157.988,65.659 161.036,65.659 162.024,64.671 162.024,63.084 U23.2
  Bottom Layer w0.4: v1(106.287,73.775) 106.287,62.54 107.105,61.722 v1(112.141,61.722)
DC: J1.3 U3.3 | length 55.3
  Top Layer w0.4: v1(202.469,91.09) U3.3
  Bottom Layer w0.4: v1(202.469,91.09) 202.469,52.801 206.121,49.149 J1.3
DC_TFT: DS1.10 U1.18 | length 129
  Top Layer w0.25: U1.18 115.83,84.578 115.83,86.112 v1(117.729,88.011) ; v1(117.729,94.107) v1(117.729,112.395)
  Bottom Layer w0.25: v1(117.729,88.011) v1(117.729,94.107)
  Bottom Layer w0.4: DS1.10 117.294,112.776 117.675,112.395 v1(117.729,112.395)
DD: J1.2 U3.4 | length 58.5
  Top Layer w0.4: v1(201.199,91.09) U3.4
  Bottom Layer w0.4: v1(201.199,91.09) 201.199,51.404 205.994,46.609 J1.2
DTR: R3.2 S2.1 U2.25 | length 9
  Top Layer w0.4: U2.25 184.263,102.348 184.785,102.87 184.785,103.886 185.166,104.267 R3.2 187.071,105.41 186.549,105.932 S2.1
GND: C1.1 C2.1 C3.1 C4.1 C5.1 C6.1 C7.1 C8.1 C9.2 C10.1 C11.1 C12.1 C13.2 C14.2 C15.1 C16.1 C17.2 C18.2 C19.1 C20.2 C21.1 C22.1 C23.2 D4.2 D9.1 DS1.13 J1.4 J2.2 J3.3 R2.2 R5.1 S1.1 S2.2 S3.1 S4.1 S5.2 S6.2 S7.2 S8.2 S9.2 U1.8 U1.23 U1.35 U1.47 U2.1 U2.15 U2.38 U2.39 U3.1 U6.2 U7.3 U9.2 U10.2 U12.2 U13.3 U13.5 U13.6 U14.2 U16.2 U18.2 U19.1 U21.2 U22.2 U23.4 | length 67
  Top Layer w0.25: C5.1@108.458,78.243 108.483,78.268 U1.35 111.53,78.278 112.451,78.278 113.355,79.181 113.852,79.181 v1(113.919,79.248) ; C2.1 112.395,86.868 113.32,85.943 U1.23 113.33,84.558 113.33,83.637 113.839,83.127 115.374,83.127 v1(116.713,81.788) ; v1(115.443,79.248) 115.443,78.74 116.101,78.082 117.371,78.082 117.82,77.633 U1.47 117.82,73.442 118.514,72.748 119.091,72.748 119.092,72.749 C3.1 ; v1(116.713,80.391) 117.468,80.391 118.345,81.268 U1.8 119.63,81.278 120.415,81.278 120.43,81.293 120.791,81.293 121.474,81.976 122.373,81.976 C4.1
  Top Layer w0.8: R5.1 115.691,66.554 116.205,66.04 129.413,66.04 130.018,66.645 D4.2
  Top Layer w1.5: U7.3 32.382,49.149 v1(34.544,49.149) ; v1(51.689,47.879) C23.2 ; C20.2 v1(59.69,29.083) ; v1(156.972,118.237) C10.1 ; C7.1 v1(206.502,98.425)
  Bottom Layer w0.25: v1(113.919,79.248) 115.506,79.248 116.649,80.391 v1(116.713,80.391) v1(116.713,81.788)
LED_BLUE: R13.1 U1.46 | length 8.5
  Top Layer w0.25: U1.46 117.32,72.431 117.488,72.263 118.066,72.263 118.637,71.691 120.206,71.691 120.446,71.451 120.446,70.595 R13.1
LED_GREEN: R11.1 U1.45 | length 6.9
  Top Layer w0.25: U1.45 116.82,72.029 117.094,71.755 117.729,71.755 118.11,71.374 118.11,70.523 R11.1
LED_RED: R10.1 U1.43 | length 7.9
  Top Layer w0.25: R10.1 113.269,71.359 113.665,71.755 115.189,71.755 115.82,72.386 U1.43
LED_TFT: R28.2 U1.14 | length 26.5
  Top Layer w0.25: R28.2 v1(109.728,93.599) ; U1.14 117.83,84.578 117.83,85.826 118.292,86.288 119.308,86.288 119.97,86.95 119.97,88.474 v1(120.015,88.519)
  Bottom Layer w0.25: v1(109.728,93.599) 109.728,95.377 110.49,96.139 118.999,96.139 120.015,95.123 v1(120.015,88.519)
NetD4_1: D4.1 R10.2 | length 22.3
  Top Layer w0.25: R10.2 113.269,66.055 114.3,65.024 130.175,65.024 130.496,65.345 D4.1
NetD4_3: D4.3 R11.2 | length 15.9
  Top Layer w0.25: R11.2 118.105,67.823 118.999,66.929 128.651,66.929 129.667,67.945 D4.3
NetD4_4: D4.4 R13.2 | length 13.3
  Top Layer w0.25: R13.2 120.523,67.945 120.777,67.691 128.397,67.691 129.951,69.245 D4.4
NetD5_1: D5.1 R14.1 | length 2.4
  Top Layer w0.4: D5.1 121.291,32.644 123.693,32.644 R14.1
NetD5_2: D5.2 D6.1 U8.2 U10.3 | length 36.4
  Top Layer w0.4: U10.3 120.122,35.814 119.888,35.58 119.888,31.095 120.122,30.861 121.274,30.861 D5.2 121.285,28.956 122.047,28.194 122.047,26.337 U8.2 ; v1(122.047,21.463) 129.667,21.463 131.572,23.368 131.572,30.049 D6.1@130.801,30.82 ; D6.1 130.126,31.496 D6.1@130.801,30.821
  Bottom Layer w0.4: U8.2 121.94,26.23 121.94,23.083 122.047,22.976 v1(122.047,21.463)
NetD7_1: D7.1 R20.1 | length 2.5
  Top Layer w0.4: D7.1 R20.1
NetD7_2: D7.2 D8.1 U11.2 U14.3 | length 37.3
  Top Layer w0.4: U14.3 140.716,35.814 140.462,35.56 140.462,31.084 140.696,30.85 D7.2 142.367,29.111 143.084,28.394 U11.2 ; v1(143.383,21.463) 151.384,21.463 152.654,22.733 152.654,30.177 151.335,31.496 D8.1
  Bottom Layer w0.4: U11.2 143.345,25.989 143.345,21.501 v1(143.383,21.463)
NetD9_2: D9.2 I1.1 U13.2 | length 13
  Top Layer w1: 27.051,37.211 32.385,37.211 34.847,39.673 U13.2
NetD10_1: D10.1 R25.1 | length 2.3
  Top Layer w0.4: D10.1 163.581,32.655 165.857,32.655 R25.1
NetD10_2: D10.2 D11.1 U15.2 U18.3 | length 36.9
  Top Layer w0.4: U18.3 162.159,35.814 161.925,35.58 161.925,31.349 162.251,31.023 163.403,31.023 D10.2 163.576,28.956 164.208,28.324 U15.2 ; v1(164.211,21.463) 172.466,21.463 173.823,22.82 173.823,30.099 172.426,31.496 D11.1
  Bottom Layer w0.4: U15.2 164.21,26.249 164.21,21.464 v1(164.211,21.463)
NetD12_1: D12.1 R30.1 | length 2.4
  Top Layer w0.4: D12.1 R30.1
NetD12_2: D12.2 D13.1 U20.2 U22.3 | length 38.7
  Top Layer w0.4: U22.3 183.007,35.941 182.245,35.179 182.245,31.496 182.891,30.85 D12.2 184.531,28.956 185.269,28.218 U20.2 ; v1(185.42,21.082) 193.675,21.082 194.945,22.352 194.945,30.041 193.49,31.496 D13.1
  Bottom Layer w0.4: U20.2 185.293,26.226 185.293,21.209 v1(185.42,21.082)
NetF1_1: F1.1 J4.2
NetF1_2: F1.2 pad.19@16.764,53.34 pad.19@16.764,54.229 pad.19@16.764,55.245 pad.19@17.653,53.34 pad.19@17.653,54.229 pad.19@17.653,55.245 U7.1
NetJ2_1: J2.1 R8.2 | length 83.3
  Top Layer w0.4: v1(99.441,103.759) 99.441,127.381 100.965,128.905 119.888,128.905 120.523,128.27 J2.1 ; v1(101.854,71.247) R8.2
  Bottom Layer w0.4: v1(99.441,103.759) 99.441,71.755 99.949,71.247 v1(101.854,71.247)
NetJ2_3: J2.3 R9.2 | length 75.6
  Top Layer w0.4: v1(109.347,68.707) 109.353,68.713 110.846,68.713 R9.2
  Bottom Layer w0.4: v1(109.347,68.707) 109.347,78.829 109.412,78.894 109.412,88.962 108.331,90.043 108.331,103.759 109.601,105.029 120.015,105.029 121.412,106.426 121.412,117.602 119.92,119.094 116.618,119.094 115.443,120.269 J2.3
NetJ4_1: J4.1 pad.19@16.891,48.26 pad.19@16.891,49.149 pad.19@16.891,50.165 pad.19@17.78,48.26 pad.19@17.78,49.149 pad.19@17.78,50.165 U7.2
NetJ5_1: J5.1 U8.4
NetJ5_2: J5.2 U8.3
NetJ5_3: J5.3 U8.5
NetJ6_1: J6.1 U11.4
NetJ6_2: J6.2 U11.3
NetJ6_3: J6.3 U11.5
NetJ7_1: J7.1 U15.4
NetJ7_2: J7.2 U15.3
NetJ7_3: J7.3 U15.5
NetJ8_1: J8.1 U20.4
NetJ8_2: J8.2 U20.3
NetJ8_3: J8.3 U20.5
NetR2_1: R2.1 U2.14 | length 3.7
  Top Layer w0.4: R2.1 162.433,101.219 163.562,102.348 U2.14
NetR6_1: R6.1 U2.23 | length 13.1
  Top Layer w0.4: U2.23 178.123,99.372 178.562,98.933 186.182,98.933 187.071,99.822 R6.1
NetR12_2: R12.2 U6.1 | length 5.6
  Top Layer w0.25: R12.2 122.428,74.168 123.444,73.152 U6.1
NetR16_2: R16.2 U9.1 | length 3.5
  Top Layer w0.4: R16.2 125.751,34.914 128.016,37.179 U9.1
NetR17_1: R17.1 U9.3 | length 10.2
  Top Layer w0.4: R17.1 127.519,32.65 128.27,33.401 131.064,33.401 132.334,34.671 U9.3
NetR17_2: R17.2 U10.1 | length 6.2
  Top Layer w0.4: U10.1 122.965,34.896 123.845,34.896 124.079,34.662 124.079,34.016 124.313,33.782 124.734,33.782 124.968,33.548 124.968,31.272 125.379,30.861 125.476,30.861 ; R17.2@126.05,31.038 R17.2
NetR22_2: R22.2 U12.1 | length 3.5
  Top Layer w0.4: R22.2 146.706,35.041 148.749,37.084 U12.1
NetR23_1: R23.1 U12.3 | length 10.2
  Top Layer w0.4: R23.1 148.579,32.65 149.203,33.274 152.019,33.274 153.289,34.544 U12.3
NetR23_2: R23.2 U14.1 | length 7
  Top Layer w0.4: U14.1 143.891,34.163 144.145,33.909 145.796,33.909 146.177,33.528 146.177,31.095 146.411,30.861 147.309,30.861 R23.2
NetR26_2: R26.2 U16.1 | length 3.2
  Top Layer w0.4: R26.2@168.158,34.787 169.854,36.483 169.854,36.631 U16.1
NetR27_1: R27.1 U16.3 | length 10.4
  Top Layer w0.4: R27.1 169.777,32.661 170.263,33.147 173.228,33.147 174.625,34.544 U16.3
NetR27_2: R27.2 U18.1 | length 6.5
  Top Layer w0.4: U18.1 165.11,34.925 165.227,34.807 165.227,34.016 165.461,33.782 165.481,33.782 165.735,33.528 166.771,33.528 167.132,33.167 167.132,31.115 167.136,31.111 168.025,31.111 R27.2
NetR28_1: R28.1 R29.2 U17.G | length 6.4
  Top Layer w0.25: U17.G R28.1@109.723,90.048
  Top Layer w0.4: R28.1@109.723,90.048 110.084,90.409 110.531,90.409 112.068,91.946 R29.2
NetR31_2: R31.2 U21.1 | length 3.4
  Top Layer w0.4: R31.2 188.845,35.418 189.382,35.418 190.921,36.957 U21.1
NetR32_1: R32.1 U21.3 | length 10.1
  Top Layer w0.4: R32.1 190.732,32.661 191.091,33.02 193.548,33.02 194.945,34.417 U21.3
NetR32_2: R32.2 U22.1 | length 6.9
  Top Layer w0.4: U22.1 186.055,34.036 186.436,33.655 187.706,33.655 188.214,33.147 188.214,31.242 188.468,30.988 189.357,30.988 R32.2
NetU5_2: U5.2 U6.3 | length 25.2
  Top Layer w0.4: U6.3 134.493,72.263 136.464,74.234 v1(136.464,84.262)
  Bottom Layer w0.4: v1(136.464,84.262) 136.5,84.297 141.696,84.297 U5.2
OSC_IN: C9.1 U1.5 U4.2 | length 13.7
  Top Layer w0.25: U1.5 126.353,79.768 126.746,79.375 U4.2 128.905,77.851 129.286,77.47 131.434,77.47 C9.1@131.445,77.459
OSC_OUT: C13.1 U1.6 U4.1 | length 14.2
  Top Layer w0.25: U1.6 125.861,80.268 126.746,81.153 U4.1 128.524,82.931 129.435,83.842 C13.1
RESET_SYSTEM: D1.2 D2.2 D3.2 R24.2 S9.1 | length 115.3
  Top Layer w0.4: R24.2 115.316,92.964 115.697,93.345 121.031,93.345 122.809,95.123 126.746,95.123 128.279,93.59 D3.2 137.55,93.59 ; S9.1@145.236,69.941 138.736,69.941 138.736,92.404 137.55,93.59 ; v1(178.943,84.074) 169.427,93.59 137.55,93.59 ; v1(181.483,84.074) 185.402,84.074 D2.2 187.089,84.346 187.706,84.963 187.706,88.138 188.214,88.646 D1.2
  Bottom Layer w0.4: v1(178.943,84.074) v1(181.483,84.074)
RESET_TFT: DS1.11 U1.19 | length 130.6
  Top Layer w0.25: U1.19 115.32,86.238 116.926,87.844 116.926,88.478 v1(116.967,88.519) ; v1(116.967,95.123) v1(116.967,114.935)
  Bottom Layer w0.25: v1(116.967,88.519) v1(116.967,95.123)
  Bottom Layer w0.4: DS1.11 116.532,115.316 116.913,114.935 v1(116.967,114.935)
Role_1: R16.1 U1.39 | length 50
  Top Layer w0.25: v1(112.903,73.533) 113.82,74.45 U1.39 ; R16.1 v1(125.476,38.989)
  Bottom Layer w0.25: 112.903,59.944 v1(112.903,73.533)
  Bottom Layer w0.4: 112.903,59.944 115.316,57.531 123.19,57.531 125.476,55.245 v1(125.476,38.989)
Role_2: R22.1 U1.40 | length 68.4
  Top Layer w0.25: v1(113.665,72.771) 113.665,73.655 114.32,74.31 U1.40 ; R22.1 v1(146.431,38.481)
  Bottom Layer w0.25: 113.665,61.341 v1(113.665,72.771)
  Bottom Layer w0.4: 113.665,61.341 115.951,59.055 124.587,59.055 126.746,56.896 126.746,41.656 129.032,39.37 145.962,39.37 146.405,38.928 146.405,38.507 v1(146.431,38.481)
Role_3: R26.1 U1.41 | length 89.6
  Top Layer w0.25: v1(114.427,73.533) 114.427,73.628 114.82,74.021 U1.41
  Top Layer w0.4: R26.1 v1(167.64,39.602)
  Bottom Layer w0.25: 114.427,62.611 v1(114.427,73.533)
  Bottom Layer w0.4: 114.427,62.611 116.459,60.579 125.603,60.579 127.889,58.293 127.889,42.418 129.794,40.513 167.259,40.513 167.64,40.132 167.64,39.116
Role_4: R31.1 U1.42 | length 109.1
  Top Layer w0.25: v1(115.127,72.771) 115.194,72.838 115.194,73.445 115.32,73.571 U1.42
  Top Layer w0.4: R31.1 v1(188.595,38.989)
  Bottom Layer w0.25: 115.127,63.689 v1(115.127,72.771)
  Bottom Layer w0.4: 115.127,63.689 116.713,62.103 126.746,62.103 129.286,59.563 129.286,43.561 131.191,41.656 187.833,41.656 188.595,40.894 v1(188.595,38.989)
RS_ESP32: C8.2 D2.1 R4.1 S3.2 U2.3 | length 58.1
  Top Layer w0.4: v1(160.147,104.394) S3.2 162.56,104.507 162.56,107.462 162.326,107.696 C8.2 161.55,107.702 161.55,110.103 R4.1 161.687,110.241 161.687,114.427 163.577,116.318 U2.3 ; v1(181.737,88.646) D2.1
  Bottom Layer w0.4: v1(160.147,104.394) 160.147,89.408 160.909,88.646 v1(181.737,88.646)
RS_STM: C12.2 D3.1 R7.1 S4.2 U1.7 | length 29
  Top Layer w0.25: U1.7 123.013,80.768 123.825,81.58 123.825,85.217 123.444,85.598 121.539,85.598 120.904,86.233 C12.2
  Top Layer w0.4: R7.1 118.298,91.771 119.146,91.771 119.38,91.537 119.38,90.678 119.813,90.245 120.818,90.245 C12.2 122.312,90.159 123.444,89.027 125.208,89.027 S4.2 129.517,89.013 D3.1
RS_ZB: C1.2 D1.1 J1.1 R1.1 S1.2 U3.24 | length 73.8
  Top Layer w0.4: D1.1 189.738,75.946 190.351,75.333 R1.1 C1.2 202.714,75.333 203.595,76.214 204.428,76.214 S1.2@204.956,76.229 ; S1.2@204.978,76.784 S1.2 206.615,76.214 207.645,75.184 207.645,59.563 209.55,57.658 217.043,57.658 218.694,56.007 218.694,44.577 218.186,44.069 J1.1 ; S1.2@204.985,76.221 U3.24@204.985,79.63
RXD: J3.1 U2.34 | length 46.7
  Top Layer w0.4: v1(180.086,113.792) 180.093,113.785 182.551,113.785 U2.34
  Bottom Layer w0.4: J3.1 145.796,119.38 148.209,116.967 178.054,116.967 180.086,114.935 v1(180.086,113.792)
SCK: DS1.8 U1.15 | length 125.7
  Top Layer w0.25: U1.15 117.32,85.332 117.345,85.357 117.345,85.977 118.106,86.738 118.727,86.738 119.253,87.265 v1(119.253,88.011) ; v1(119.253,94.107) v1(119.253,107.188)
  Bottom Layer w0.25: v1(119.253,88.011) v1(119.253,94.107)
  Bottom Layer w0.4: DS1.8 118.691,107.696 119.199,107.188 v1(119.253,107.188)
SDI(MOSI): DS1.9 U1.17 | length 127.4
  Top Layer w0.25: U1.17 116.33,84.578 116.33,85.85 116.86,86.38 117.668,87.188 118.176,87.188 118.45,87.462 118.45,88.478 v1(118.491,88.519) ; v1(118.491,95.123) v1(118.491,109.474)
  Bottom Layer w0.25: v1(118.491,88.519) v1(118.491,95.123)
  Bottom Layer w0.4: DS1.9 117.697,110.236 118.459,109.474 v1(118.491,109.474)
SWCLK: R9.1 U1.37 | length 7.1
  Top Layer w0.25: R9.1 110.871,70.538 110.871,73.152 111.506,73.787 112.141,73.787 112.82,74.466 U1.37
SWDIO: R8.1 U1.34 | length 15.6
  Top Layer w0.25: R8.1 v1(107.315,71.247) ; v1(108.458,80.01) 109.347,80.01 109.728,79.629 109.728,79.121 110.081,78.768 U1.34
  Bottom Layer w0.25: v1(107.315,71.247) 108.458,72.39 v1(108.458,80.01)
TFT_LED: DS1.7 U17.D | length 100.5
  Top Layer w0.4: v1(104.648,94.742) 104.648,91.03 U17.D
  Bottom Layer w0.4: DS1.7 103.251,105.156 104.648,103.759 v1(104.648,94.742)
TXD: J3.2 U2.35 | length 49.1
  Top Layer w0.4: v1(178.181,115.062) 178.188,115.055 182.551,115.055 U2.35
  Bottom Layer w0.4: J3.2 143.256,117.602 145.796,115.062 v1(178.181,115.062)
UART1_STM_RX: U1.31 U3.20 | length 97.9
  Top Layer w0.25: U1.31 113.669,80.268 114.554,81.153 v1(114.554,81.248)
  Top Layer w0.4: v1(196.215,77.851) 199.517,77.851 199.929,78.263 U3.20
  Bottom Layer w0.25: v1(114.554,81.248) 115.856,82.55 118.999,82.55 122.809,86.36 173.482,86.36 183.505,76.337 195.664,76.337 196.215,76.888 v1(196.215,77.851)
UART1_STM_TX: U1.30 U3.21 | length 98.6
  Top Layer w0.25: U1.30 113.026,80.768 v1(113.538,81.28)
  Top Layer w0.4: v1(195.072,76.962) 199.771,76.962 201.199,78.39 U3.21
  Bottom Layer w0.25: v1(113.538,81.28) 115.316,83.058 118.491,83.058 122.809,87.376 173.863,87.376 184.277,76.962 v1(195.072,76.962)
UART3_STM_RX: U1.22 U2.30 | length 132.9
  Top Layer w0.25: U1.22 113.82,87.855 113.664,88.011 103.505,88.011 102.743,88.773 102.743,115.824 106.426,119.507 126.746,119.507 129.667,116.586 129.667,110.236 133.114,106.789 v1(151.514,106.789)
  Top Layer w0.4: v1(178.137,106.789) 180.046,108.698 U2.30
  Bottom Layer w0.25: v1(151.514,106.789) v1(178.137,106.789)
UART3_STM_TX: U1.21 U2.31 | length 131.3
  Top Layer w0.25: U1.21 114.32,87.864 114.3,87.884 114.3,88.011 113.411,88.9 104.013,88.9 103.632,89.281 103.632,114.935 106.807,118.11 126.111,118.11 128.27,115.951 128.27,109.474 132.08,105.664 v1(151.511,105.664)
  Top Layer w0.4: v1(175.387,105.664) 179.691,109.968 U2.31
  Bottom Layer w0.25: v1(151.511,105.664) v1(175.387,105.664)
pads on no net: DS1.1 DS1.2 DS1.3 DS1.4 DS1.5 DS1.6 U1.1 U1.3 U1.4 U1.10 U1.11 U1.12 U1.13 U1.16 U1.32 U1.33 U1.38 U2.4 U2.5 U2.6 U2.7 U2.8 U2.9 U2.10 U2.11 U2.12 U2.13 U2.16 U2.17 U2.18 U2.19 U2.20 U2.21 U2.22 U2.24 U2.26 U2.27 U2.28 U2.29 U2.32 U2.33 U2.36 U2.37 U3.5 U3.6 U3.7 U3.8 U3.9 U3.10 U3.11 U3.12 U3.13 U3.14 U3.15 U3.16 U3.17 U3.18 U3.19 U3.22 U3.23 U23.3

## Polygon pours and split planes (outlines as drawn)
GND on Bottom Layer "NONET_L01_P-001" (solid, remove dead copper, pour order 43): 0,148.463 10.668,137.795 227.076,137.795 227.076,5.334 221.742,0 0,0
+12 on Bottom Layer "+12_L02_P031" (solid, pour order 31): 46.355,57.233 46.72,57.529 48.387,57.531 48.768,57.15 48.768,45.085 48.514,44.831 46.609,44.831 46.355,45.085
NetF1_1 on Bottom Layer "NETF1_1_L02_P022" (solid, pour order 22): 6.096,39.751 6.477,40.132 11.684,40.132 12.065,39.751 12.065,25.527 11.684,25.146 6.604,25.146 6.096,25.552
NetJ4_1 on Bottom Layer "NETJ4_1_L02_P021" (solid, pour order 21): 6.096,23.114 6.5,23.518 14.529,23.47 15.367,24.448 15.367,50.385 15.748,50.793 18.139,50.793 18.542,50.432 18.542,21.082 17.653,20.193 6.477,20.193 6.096,20.574
NetF1_2 on Bottom Layer "NETF1_2_L02_P018" (solid, pour order 18): 7.493,56.515 17.907,56.515 18.161,56.261 18.161,52.705 17.907,52.451 11.176,52.451
NetJ5_2 on Bottom Layer "NETJ5_2_L02_P004" (solid, pour order 4): 126.238,29.718 130.048,29.718 130.048,2.667 126.238,2.667
NetF1_2 on Bottom Layer "NETF1_2_L02_P014" (solid, pour order 14): 6.985,56.007 7.493,56.515 10.668,56.515 11.176,56.007 11.176,48.641 10.795,48.26 7.366,48.26 6.985,48.641
NetJ8_1 on Bottom Layer "NETJ8_1_L02_P012" (solid, pour order 12): 199.009,15.748 199.009,2.667 194.691,2.667 194.691,7.239 195.199,7.747 195.834,7.747 195.834,15.748
NetJ7_1 on Bottom Layer "NETJ7_1_L02_P011" (solid, pour order 11): 177.927,15.748 177.927,2.667 173.609,2.667 173.609,7.239 174.117,7.747 174.752,7.747 174.752,15.748
NetJ6_1 on Bottom Layer "NETJ6_1_L02_P010" (solid, pour order 10): 156.718,15.748 156.718,2.667 152.4,2.667 152.4,7.239 152.908,7.747 153.543,7.747 153.543,15.748
NetJ5_1 on Bottom Layer "NETJ5_1_L02_P009" (solid, pour order 9): 135.636,15.875 135.636,2.794 131.318,2.794 131.318,7.366 131.826,7.874 132.461,7.874 132.461,15.875
NetJ8_2 on Bottom Layer "NETJ8_2_L02_P007" (solid, pour order 7): 189.611,29.591 193.421,29.591 193.421,2.667 189.611,2.667
NetJ7_2 on Bottom Layer "NETJ7_2_L02_P006" (solid, pour order 6): 168.466,29.664 172.276,29.664 172.276,2.74 168.466,2.74
NetJ6_2 on Bottom Layer "NETJ6_2_L02_P005" (solid, pour order 5): 147.294,29.664 151.104,29.664 151.104,2.74 147.294,2.74
NetJ8_3 on Bottom Layer "NETJ8_3_L02_P003" (solid, pour order 3): 183.48,15.732 186.782,15.732 186.782,7.858 187.671,7.858 188.306,7.223 188.306,2.651 183.48,2.651
NetJ7_3 on Bottom Layer "NETJ7_3_L02_P002" (solid, pour order 2): 162.525,15.732 165.827,15.732 165.827,7.858 166.716,7.858 167.351,7.223 167.351,2.651 162.525,2.651
NetJ6_3 on Bottom Layer "NETJ6_3_L02_P001" (solid, pour order 1): 141.316,15.732 144.618,15.732 144.618,7.858 145.507,7.858 146.142,7.223 146.142,2.651 141.316,2.651
NetJ5_3 on Bottom Layer "NETJ5_3_L02_P000" (solid, pour order 0): 120.269,15.748 123.571,15.748 123.571,7.874 124.46,7.874 125.095,7.239 125.095,2.667 120.269,2.667
GND on Top Layer "NONET_L01_P-001" (solid, remove dead copper, pour order 44): 0,148.082 10.287,137.795 239.776,137.795 239.776,16.764 223.012,0 0,0
NetD9_2 on Top Layer "NETD9_2_L01_P024" (solid, pour order 24): 24.892,41.91 25.273,42.291 28.194,42.291 28.575,41.91 28.575,35.052 28.956,34.671 31.242,34.671 31.623,34.29 31.623,29.845 31.242,29.464 25.908,29.464 25.527,29.845 25.527,39.497 25.146,39.497 24.892,39.751
+3.3 on Top Layer "+3.3_L01_P034" (solid, remove dead copper, pour order 34): 57.785,37.719 57.023,38.481 57.023,45.72 57.658,46.355 58.921,46.355 59.563,46.997 59.563,53.086 59.055,53.594 50.927,53.594 50.165,54.356 50.165,57.404 50.8,58.039 52.578,58.039 53.34,57.277 53.34,55.88 53.467,55.88 54.229,55.118 60.579,55.118 61.468,54.229 61.468,46.99 62.103,46.355 63.373,46.355 64.008,45.72 64.008,38.354 63.373,37.719
+5 on Top Layer "+5_L01_P025" (solid, remove dead copper, pour order 25): 25.52,23.241 26.155,23.876 61.341,23.876 62.103,24.638 62.103,19.811 61.341,19.813 58.547,19.805 58.032,20.32 58.032,21.717 57.651,22.098 43.808,22.098 43.173,21.463 43.173,19.812 42.665,19.304 26.028,19.304 25.52,19.812
NetJ4_1 on Top Layer "NETJ4_1_L01_P019" (solid, pour order 19): 16.129,50.564 16.365,50.8 24.828,50.8 25.082,50.546 25.082,47.879 24.828,47.625 16.373,47.634 16.129,47.878
NetF1_2 on Top Layer "NETF1_2_L01_P033" (solid, pour order 33): 16.102,55.639 16.339,55.876 24.802,55.876 25.056,55.622 25.056,52.955 24.802,52.701 16.346,52.709 16.102,52.954